# Altium PCB POV_Display.PcbDoc (part 3 of 4)
Units mm, origin at the board's own origin, x right, y up, seen from the top; angles counter-clockwise.
Board outline 207.01 x 48.01 mm, 4 copper layers (Top Layer, GND, Power, Bottom Layer), stack 1.586 mm thick; 227 components, 374 nets, 1196 pads, 657 vias.
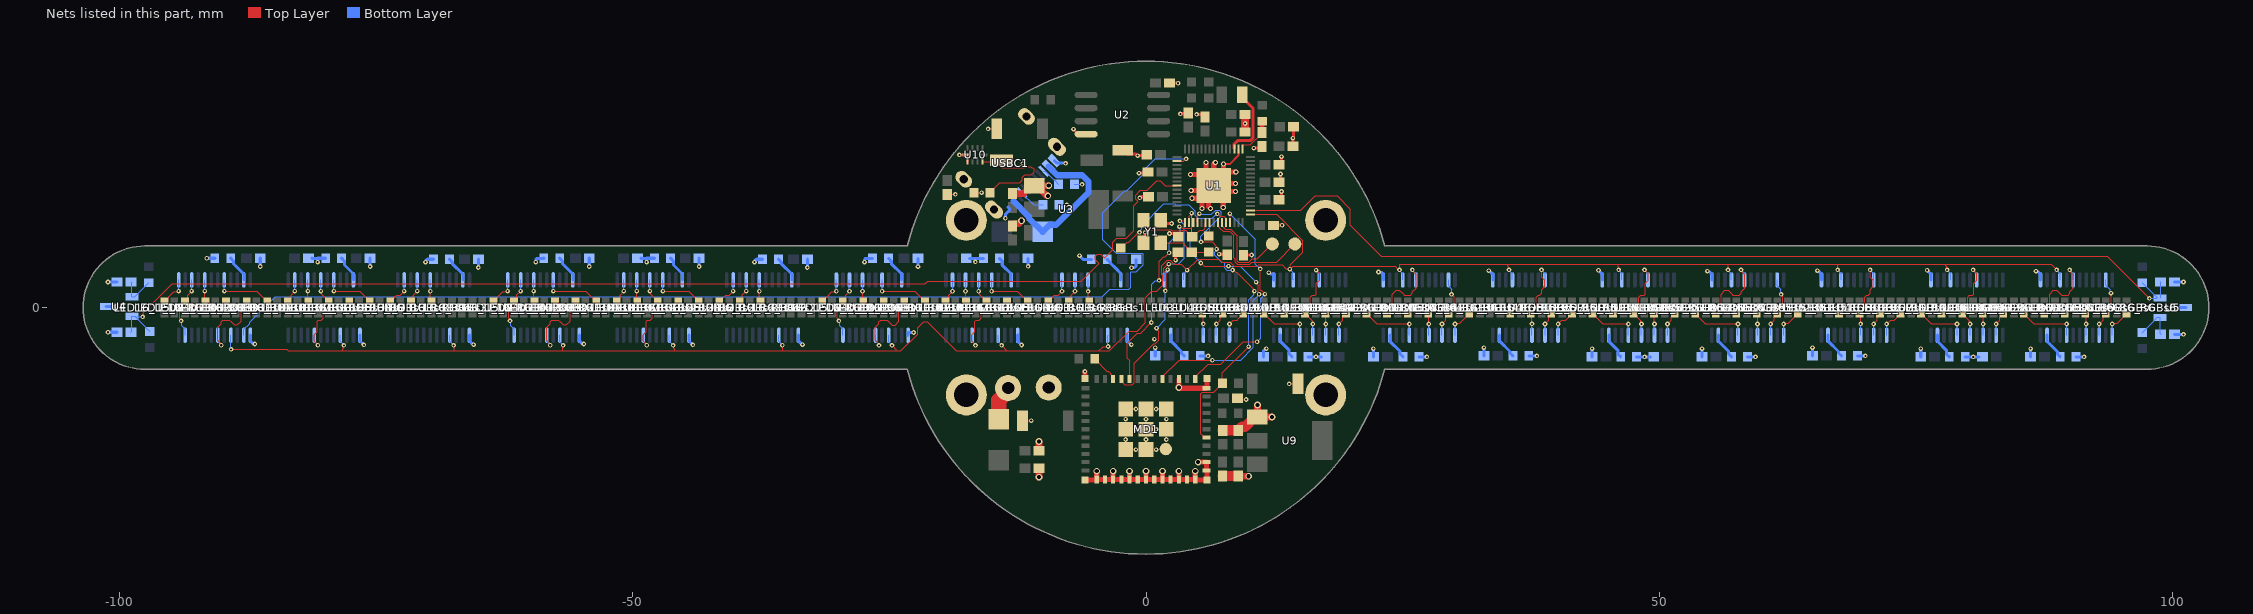
[diagram p5: the nets of this part, all layers, seen from the top]

## Via types
v1: diameter 0.45, hole 0.2, Top Layer to Bottom Layer, tented both sides, 605 vias
v2: diameter 0.65, hole 0.4, Top Layer to Bottom Layer, tented both sides, 28 vias
v3: diameter 0.5, hole 0.3, Top Layer to Bottom Layer, tented both sides, 12 vias
v4: diameter 0.45, hole 0.2, Top Layer to Bottom Layer, 12 vias

## Nets (pads, with @x,y where several pads share a name; then routed paths per layer and width w, separated by ;. In a path a pad name is that pad's centre, name@x,y a point inside that pad or via, vN(x,y) a via of type N, cw(c..) or ccw(c..) an arc to the next point about the centre after c; other vN are vias at no path point) (continued)
G1_U_16_RGBs5: LED2_U_16_RGBs5.3 U6_U_16_RGBs5.9 | length 8
  Top Layer w0.1: LED2_U_16_RGBs5.3@35.475,-0.62 35.499,-0.62 36.238,0.119 37.912,0.119 38,0.207 38,1.032 38.185,1.217 38.347,1.217 38.514,1.384 38.514,1.747 38.833,2.066 38.833,2.664 38.52,2.978 v1(38.52,3.671)
  Bottom Layer w0.1: v1(38.52,3.671) 38.52,3.637 38.857,3.299 U6_U_16_RGBs5.9@38.857,2.692
G1_U_16_RGBs6: LED2_U_16_RGBs6.3 U6_U_16_RGBs6.9 | length 8
  Top Layer w0.1: LED2_U_16_RGBs6.3@67.475,-0.62 67.499,-0.62 68.238,0.119 69.912,0.119 70,0.207 70,1.032 70.185,1.217 70.347,1.217 70.514,1.384 70.514,1.747 70.833,2.066 70.833,2.664 70.52,2.978 v1(70.52,3.671)
  Bottom Layer w0.1: v1(70.52,3.671) 70.52,3.637 70.858,3.299 U6_U_16_RGBs6.9@70.858,2.692
G2_U_16_RGBs1: LED3_U_16_RGBs1.3 U6_U_16_RGBs1.18 | length 2.1
  Top Layer w0.1: v1(-5.641,1.587) -5.641,0.732 LED3_U_16_RGBs1.3@-5.529,0.62
  Bottom Layer w0.1: v1(-5.641,1.587) U6_U_16_RGBs1.18@-5.641,2.692
G2_U_16_RGBs2: LED3_U_16_RGBs2.3 U6_U_16_RGBs2.18 | length 2.1
  Top Layer w0.1: v1(-37.659,1.596) -37.659,0.74 LED3_U_16_RGBs2.3@-37.546,0.628
  Bottom Layer w0.1: v1(-37.659,1.596) U6_U_16_RGBs2.18@-37.659,2.701
G2_U_16_RGBs3: LED3_U_16_RGBs3.3 U6_U_16_RGBs3.18 | length 2.1
  Top Layer w0.1: v1(-69.695,1.595) -69.695,0.74 LED3_U_16_RGBs3.3@-69.582,0.627
  Bottom Layer w0.1: v1(-69.695,1.595) U6_U_16_RGBs3.18@-69.695,2.7
G2_U_16_RGBs4: LED3_U_16_RGBs4.3 U6_U_16_RGBs4.18 | length 2.1
  Top Layer w0.1: LED3_U_16_RGBs4.3@5.475,-0.62 5.587,-0.732 v1(5.587,-1.587)
  Bottom Layer w0.1: U6_U_16_RGBs4.18@5.587,-2.692 v1(5.587,-1.587)
G2_U_16_RGBs5: LED3_U_16_RGBs5.3 U6_U_16_RGBs5.18 | length 2.1
  Top Layer w0.1: LED3_U_16_RGBs5.3@37.475,-0.62 37.587,-0.732 v1(37.587,-1.587)
  Bottom Layer w0.1: U6_U_16_RGBs5.18@37.587,-2.692 v1(37.587,-1.587)
G2_U_16_RGBs6: LED3_U_16_RGBs6.3 U6_U_16_RGBs6.18 | length 2.1
  Top Layer w0.1: LED3_U_16_RGBs6.3@69.475,-0.62 69.588,-0.732 v1(69.588,-1.587)
  Bottom Layer w0.1: U6_U_16_RGBs6.18@69.588,-2.692 v1(69.588,-1.587)
G3_U_16_RGBs1: LED4_U_16_RGBs1.3 U6_U_16_RGBs1.16 | length 2.3
  Top Layer w0.1: LED4_U_16_RGBs1.3@-7.529,0.62 -7.283,0.866 -7.283,1.221 v1(-6.911,1.592)
  Bottom Layer w0.1: v1(-6.911,1.592) U6_U_16_RGBs1.16@-6.911,2.692
G3_U_16_RGBs2: LED4_U_16_RGBs2.3 U6_U_16_RGBs2.16 | length 2.3
  Top Layer w0.1: LED4_U_16_RGBs2.3@-39.546,0.628 -39.3,0.874 -39.3,1.229 v1(-38.929,1.6)
  Bottom Layer w0.1: v1(-38.929,1.6) U6_U_16_RGBs2.16@-38.929,2.701
G3_U_16_RGBs3: LED4_U_16_RGBs3.3 U6_U_16_RGBs3.16 | length 2.3
  Top Layer w0.1: LED4_U_16_RGBs3.3@-71.582,0.627 -71.336,0.874 -71.336,1.228 v1(-70.965,1.599)
  Bottom Layer w0.1: v1(-70.965,1.599) U6_U_16_RGBs3.16@-70.965,2.7
G3_U_16_RGBs4: LED4_U_16_RGBs4.3 U6_U_16_RGBs4.16 | length 2.3
  Top Layer w0.1: v1(6.857,-1.592) 7.229,-1.221 7.229,-0.866 LED4_U_16_RGBs4.3@7.475,-0.62
  Bottom Layer w0.1: U6_U_16_RGBs4.16@6.857,-2.692 v1(6.857,-1.592)
G3_U_16_RGBs5: LED4_U_16_RGBs5.3 U6_U_16_RGBs5.16 | length 2.3
  Top Layer w0.1: v1(38.857,-1.592) 39.229,-1.221 39.229,-0.866 LED4_U_16_RGBs5.3@39.475,-0.62
  Bottom Layer w0.1: U6_U_16_RGBs5.16@38.857,-2.692 v1(38.857,-1.592)
G3_U_16_RGBs6: LED4_U_16_RGBs6.3 U6_U_16_RGBs6.16 | length 2.3
  Top Layer w0.1: v1(70.858,-1.592) 71.229,-1.221 71.229,-0.866 LED4_U_16_RGBs6.3@71.475,-0.62
  Bottom Layer w0.1: U6_U_16_RGBs6.16@70.858,-2.692 v1(70.858,-1.592)
G4_U_16_RGBs1: LED5_U_16_RGBs1.3 U6_U_16_RGBs1.14 | length 2.9
  Top Layer w0.1: LED5_U_16_RGBs1.3@-9.529,0.62 -9.505,0.62 -9.104,1.021 -9.104,1.032 -8.919,1.217 -8.556,1.217 v1(-8.181,1.592)
  Bottom Layer w0.1: v1(-8.181,1.592) U6_U_16_RGBs1.14@-8.181,2.692
G4_U_16_RGBs2: LED5_U_16_RGBs2.3 U6_U_16_RGBs2.14 | length 2.9
  Top Layer w0.1: LED5_U_16_RGBs2.3@-41.546,0.628 -41.522,0.628 -41.121,1.029 -41.121,1.041 -40.936,1.225 -40.574,1.225 v1(-40.199,1.6)
  Bottom Layer w0.1: v1(-40.199,1.6) U6_U_16_RGBs2.14@-40.199,2.701
G4_U_16_RGBs3: LED5_U_16_RGBs3.3 U6_U_16_RGBs3.14 | length 2.9
  Top Layer w0.1: LED5_U_16_RGBs3.3@-73.582,0.627 -73.558,0.627 -73.157,1.029 -73.157,1.04 -72.973,1.224 -72.61,1.224 v1(-72.235,1.599)
  Bottom Layer w0.1: v1(-72.235,1.599) U6_U_16_RGBs3.14@-72.235,2.7
G4_U_16_RGBs4: LED5_U_16_RGBs4.3 U6_U_16_RGBs4.14 | length 2.9
  Top Layer w0.1: v1(8.127,-1.592) 8.503,-1.217 8.865,-1.217 9.05,-1.032 9.05,-1.021 9.451,-0.62 LED5_U_16_RGBs4.3@9.475,-0.62
  Bottom Layer w0.1: U6_U_16_RGBs4.14@8.127,-2.692 v1(8.127,-1.592)
G4_U_16_RGBs5: LED5_U_16_RGBs5.3 U6_U_16_RGBs5.14 | length 2.9
  Top Layer w0.1: v1(40.127,-1.592) 40.502,-1.217 40.865,-1.217 41.05,-1.032 41.05,-1.021 41.451,-0.62 LED5_U_16_RGBs5.3@41.475,-0.62
  Bottom Layer w0.1: U6_U_16_RGBs5.14@40.127,-2.692 v1(40.127,-1.592)
G4_U_16_RGBs6: LED5_U_16_RGBs6.3 U6_U_16_RGBs6.14 | length 2.9
  Top Layer w0.1: v1(72.128,-1.592) 72.503,-1.217 72.865,-1.217 73.05,-1.032 73.05,-1.021 73.451,-0.62 LED5_U_16_RGBs6.3@73.475,-0.62
  Bottom Layer w0.1: U6_U_16_RGBs6.14@72.128,-2.692 v1(72.128,-1.592)
G5_U_16_RGBs1: LED6_U_16_RGBs1.3 U7_U_16_RGBs1.20 | length 5
  Top Layer w0.1: v1(-15.031,1.592) -12.525,1.592 -11.553,0.62 LED6_U_16_RGBs1.3@-11.529,0.62
  Bottom Layer w0.1: v1(-15.031,1.592) U7_U_16_RGBs1.20@-15.031,2.692
G5_U_16_RGBs2: LED6_U_16_RGBs2.3 U7_U_16_RGBs2.20 | length 5
  Top Layer w0.1: v1(-47.049,1.6) -44.542,1.6 -43.57,0.628 LED6_U_16_RGBs2.3@-43.546,0.628
  Bottom Layer w0.1: v1(-47.049,1.6) U7_U_16_RGBs2.20@-47.049,2.701
G5_U_16_RGBs3: LED6_U_16_RGBs3.3 U7_U_16_RGBs3.20 | length 5
  Top Layer w0.1: v1(-79.085,1.599) -76.579,1.599 -75.607,0.627 LED6_U_16_RGBs3.3@-75.582,0.627
  Bottom Layer w0.1: v1(-79.085,1.599) U7_U_16_RGBs3.20@-79.085,2.7
G5_U_16_RGBs4: LED6_U_16_RGBs4.3 U7_U_16_RGBs4.20 | length 5
  Top Layer w0.1: LED6_U_16_RGBs4.3@11.475,-0.62 11.499,-0.62 12.471,-1.592 v1(14.978,-1.592)
  Bottom Layer w0.1: U7_U_16_RGBs4.20@14.978,-2.692 v1(14.978,-1.592)
G5_U_16_RGBs5: LED6_U_16_RGBs5.3 U7_U_16_RGBs5.20 | length 5
  Top Layer w0.1: LED6_U_16_RGBs5.3@43.475,-0.62 43.499,-0.62 44.471,-1.592 v1(46.978,-1.592)
  Bottom Layer w0.1: U7_U_16_RGBs5.20@46.978,-2.692 v1(46.978,-1.592)
G5_U_16_RGBs6: LED6_U_16_RGBs6.3 U7_U_16_RGBs6.20 | length 5
  Top Layer w0.1: LED6_U_16_RGBs6.3@75.475,-0.62 75.499,-0.62 76.471,-1.592 v1(78.978,-1.592)
  Bottom Layer w0.1: U7_U_16_RGBs6.20@78.978,-2.692 v1(78.978,-1.592)
G6_U_16_RGBs1: LED7_U_16_RGBs1.3 U7_U_16_RGBs1.8 | length 8.2
  Top Layer w0.1: v1(-16.599,-3.671) -16.599,-3.659 -16.964,-3.294 -16.964,-2.658 -16.654,-2.348 -16.654,-1.319 -16.551,-1.217 -16.239,-1.217 -16.054,-1.032 -16.054,-0.207 -15.966,-0.119 -14.292,-0.119 -13.553,0.62 LED7_U_16_RGBs1.3@-13.529,0.62
  Bottom Layer w0.1: U7_U_16_RGBs1.8@-16.936,-2.692 -16.936,-3.299 -16.599,-3.637 v1(-16.599,-3.671)
G6_U_16_RGBs2: LED7_U_16_RGBs2.3 U7_U_16_RGBs2.8 | length 8.2
  Top Layer w0.1: v1(-48.616,-3.663) -48.616,-3.651 -48.981,-3.285 -48.981,-2.65 -48.671,-2.34 -48.671,-1.311 -48.569,-1.209 -48.256,-1.209 -48.071,-1.024 -48.071,-0.199 -47.983,-0.111 -46.309,-0.111 -45.57,0.628 LED7_U_16_RGBs2.3@-45.546,0.628
  Bottom Layer w0.1: U7_U_16_RGBs2.8@-48.954,-2.684 -48.954,-3.291 -48.616,-3.629 v1(-48.616,-3.663)
G6_U_16_RGBs3: LED7_U_16_RGBs3.3 U7_U_16_RGBs3.8 | length 8.2
  Top Layer w0.1: v1(-80.652,-3.663) -80.652,-3.651 -81.018,-3.286 -81.018,-2.651 -80.707,-2.341 -80.707,-1.312 -80.605,-1.209 -80.292,-1.209 -80.107,-1.024 -80.107,-0.2 -80.019,-0.112 -78.346,-0.112 -77.607,0.627 LED7_U_16_RGBs3.3@-77.582,0.627
  Bottom Layer w0.1: U7_U_16_RGBs3.8@-80.99,-2.685 -80.99,-3.291 -80.652,-3.629 v1(-80.652,-3.663)
G6_U_16_RGBs4: LED7_U_16_RGBs4.3 U7_U_16_RGBs4.8 | length 8.1
  Top Layer w0.1: LED7_U_16_RGBs4.3@13.475,-0.62 13.499,-0.62 14.238,0.119 15.912,0.119 16,0.207 16,1.032 16.185,1.217 16.497,1.217 16.6,1.319 16.6,2.348 16.91,2.658 16.91,3.294 16.565,3.639 v1(16.565,3.655)
  Bottom Layer w0.1: v1(16.565,3.655) 16.565,3.619 16.883,3.301 U7_U_16_RGBs4.8@16.883,2.692
G6_U_16_RGBs5: LED7_U_16_RGBs5.3 U7_U_16_RGBs5.8 | length 8.2
  Top Layer w0.1: LED7_U_16_RGBs5.3@45.475,-0.62 45.499,-0.62 46.238,0.119 47.912,0.119 48,0.207 48,1.032 48.185,1.217 48.497,1.217 48.6,1.319 48.6,2.348 48.91,2.658 48.91,3.294 48.545,3.659 v1(48.545,3.671)
  Bottom Layer w0.1: v1(48.545,3.671) 48.545,3.637 48.883,3.299 U7_U_16_RGBs5.8@48.883,2.692
G6_U_16_RGBs6: LED7_U_16_RGBs6.3 U7_U_16_RGBs6.8 | length 8.2
  Top Layer w0.1: LED7_U_16_RGBs6.3@77.475,-0.62 77.499,-0.62 78.238,0.119 79.912,0.119 80,0.207 80,1.032 80.185,1.217 80.497,1.217 80.6,1.319 80.6,2.348 80.91,2.658 80.91,3.294 80.545,3.659 v1(80.545,3.671)
  Bottom Layer w0.1: v1(80.545,3.671) 80.545,3.637 80.883,3.299 U7_U_16_RGBs6.8@80.883,2.692
G7_U_16_RGBs1: LED8_U_16_RGBs1.3 U7_U_16_RGBs1.18 | length 2.4
  Top Layer w0.1: v1(-16.301,1.592) -16.235,1.525 -16.235,1.301 -15.553,0.62 LED8_U_16_RGBs1.3@-15.529,0.62
  Bottom Layer w0.1: v1(-16.301,1.592) U7_U_16_RGBs1.18@-16.301,2.692
G7_U_16_RGBs2: LED8_U_16_RGBs2.3 U7_U_16_RGBs2.18 | length 2.4
  Top Layer w0.1: v1(-48.319,1.6) -48.252,1.533 -48.252,1.309 -47.57,0.628 LED8_U_16_RGBs2.3@-47.546,0.628
  Bottom Layer w0.1: v1(-48.319,1.6) U7_U_16_RGBs2.18@-48.319,2.701
G7_U_16_RGBs3: LED8_U_16_RGBs3.3 U7_U_16_RGBs3.18 | length 2.4
  Top Layer w0.1: v1(-80.355,1.599) -80.288,1.532 -80.288,1.309 -79.607,0.627 LED8_U_16_RGBs3.3@-79.582,0.627
  Bottom Layer w0.1: v1(-80.355,1.599) U7_U_16_RGBs3.18@-80.355,2.7
G7_U_16_RGBs4: LED8_U_16_RGBs4.3 U7_U_16_RGBs4.18 | length 2.4
  Top Layer w0.1: LED8_U_16_RGBs4.3@15.475,-0.62 15.499,-0.62 16.181,-1.301 16.181,-1.525 v1(16.248,-1.592)
  Bottom Layer w0.1: U7_U_16_RGBs4.18@16.248,-2.692 v1(16.248,-1.592)
G7_U_16_RGBs5: LED8_U_16_RGBs5.3 U7_U_16_RGBs5.18 | length 2.4
  Top Layer w0.1: LED8_U_16_RGBs5.3@47.475,-0.62 47.499,-0.62 48.181,-1.301 48.181,-1.525 v1(48.248,-1.592)
  Bottom Layer w0.1: U7_U_16_RGBs5.18@48.248,-2.692 v1(48.248,-1.592)
G7_U_16_RGBs6: LED8_U_16_RGBs6.3 U7_U_16_RGBs6.18 | length 2.4
  Top Layer w0.1: LED8_U_16_RGBs6.3@79.475,-0.62 79.499,-0.62 80.181,-1.301 80.181,-1.525 v1(80.248,-1.592)
  Bottom Layer w0.1: U7_U_16_RGBs6.18@80.248,-2.692 v1(80.248,-1.592)
G8_U_16_RGBs1: LED9_U_16_RGBs1.3 U7_U_16_RGBs1.16 | length 2.1
  Top Layer w0.1: v1(-17.571,1.592) -17.571,0.662 LED9_U_16_RGBs1.3@-17.529,0.62
  Bottom Layer w0.1: v1(-17.571,1.592) U7_U_16_RGBs1.16@-17.571,2.692
G8_U_16_RGBs2: LED9_U_16_RGBs2.3 U7_U_16_RGBs2.16 | length 2.1
  Top Layer w0.1: v1(-49.589,1.6) -49.589,0.67 LED9_U_16_RGBs2.3@-49.546,0.628
  Bottom Layer w0.1: v1(-49.589,1.6) U7_U_16_RGBs2.16@-49.589,2.701
G8_U_16_RGBs3: LED9_U_16_RGBs3.3 U7_U_16_RGBs3.16 | length 2.1
  Top Layer w0.1: v1(-81.625,1.599) -81.625,0.67 LED9_U_16_RGBs3.3@-81.582,0.627
  Bottom Layer w0.1: v1(-81.625,1.599) U7_U_16_RGBs3.16@-81.625,2.7
G8_U_16_RGBs4: LED9_U_16_RGBs4.3 U7_U_16_RGBs4.16 | length 2.1
  Top Layer w0.1: LED9_U_16_RGBs4.3@17.475,-0.62 17.518,-0.662 v1(17.518,-1.592)
  Bottom Layer w0.1: U7_U_16_RGBs4.16@17.518,-2.692 v1(17.518,-1.592)
G8_U_16_RGBs5: LED9_U_16_RGBs5.3 U7_U_16_RGBs5.16 | length 2.1
  Top Layer w0.1: LED9_U_16_RGBs5.3@49.475,-0.62 49.518,-0.662 v1(49.518,-1.592)
  Bottom Layer w0.1: U7_U_16_RGBs5.16@49.518,-2.692 v1(49.518,-1.592)
G8_U_16_RGBs6: LED9_U_16_RGBs6.3 U7_U_16_RGBs6.16 | length 2.1
  Top Layer w0.1: LED9_U_16_RGBs6.3@81.475,-0.62 81.518,-0.662 v1(81.518,-1.592)
  Bottom Layer w0.1: U7_U_16_RGBs6.16@81.518,-2.692 v1(81.518,-1.592)
G9_U_16_RGBs1: LED10_U_16_RGBs1.3 U7_U_16_RGBs1.14 | length 2.4
  Top Layer w0.1: LED10_U_16_RGBs1.3@-19.529,0.62 -19.505,0.62 -19.204,0.92 -19.204,1.212 -18.841,1.575 v1(-18.841,1.592)
  Bottom Layer w0.1: v1(-18.841,1.592) U7_U_16_RGBs1.14@-18.841,2.692
G9_U_16_RGBs2: LED10_U_16_RGBs2.3 U7_U_16_RGBs2.14 | length 2.4
  Top Layer w0.1: LED10_U_16_RGBs2.3@-51.546,0.628 -51.522,0.628 -51.222,0.928 -51.222,1.22 -50.859,1.583 v1(-50.859,1.6)
  Bottom Layer w0.1: v1(-50.859,1.6) U7_U_16_RGBs2.14@-50.859,2.701
G9_U_16_RGBs3: LED10_U_16_RGBs3.3 U7_U_16_RGBs3.14 | length 2.4
  Top Layer w0.1: LED10_U_16_RGBs3.3@-83.582,0.627 -83.558,0.627 -83.258,0.928 -83.258,1.22 -82.895,1.583 v1(-82.895,1.599)
  Bottom Layer w0.1: v1(-82.895,1.599) U7_U_16_RGBs3.14@-82.895,2.7
G9_U_16_RGBs4: LED10_U_16_RGBs4.3 U7_U_16_RGBs4.14 | length 2.4
  Top Layer w0.1: v1(18.788,-1.592) 18.788,-1.575 19.15,-1.212 19.15,-0.92 19.451,-0.62 LED10_U_16_RGBs4.3@19.475,-0.62
  Bottom Layer w0.1: U7_U_16_RGBs4.14@18.788,-2.692 v1(18.788,-1.592)
G9_U_16_RGBs5: LED10_U_16_RGBs5.3 U7_U_16_RGBs5.14 | length 2.4
  Top Layer w0.1: v1(50.788,-1.592) 50.788,-1.575 51.15,-1.212 51.15,-0.92 51.451,-0.62 LED10_U_16_RGBs5.3@51.475,-0.62
  Bottom Layer w0.1: U7_U_16_RGBs5.14@50.788,-2.692 v1(50.788,-1.592)
G9_U_16_RGBs6: LED10_U_16_RGBs6.3 U7_U_16_RGBs6.14 | length 2.4
  Top Layer w0.1: v1(82.788,-1.592) 82.788,-1.575 83.15,-1.212 83.15,-0.92 83.451,-0.62 LED10_U_16_RGBs6.3@83.475,-0.62
  Bottom Layer w0.1: U7_U_16_RGBs6.14@82.788,-2.692 v1(82.788,-1.592)
G10_U_16_RGBs1: LED11_U_16_RGBs1.3 U8_U_16_RGBs1.20 | length 5.7
  Top Layer w0.1: v1(-25.701,1.592) -22.525,1.592 -21.553,0.62 LED11_U_16_RGBs1.3@-21.529,0.62
  Bottom Layer w0.1: v1(-25.701,1.592) U8_U_16_RGBs1.20@-25.701,2.692
G10_U_16_RGBs2: LED11_U_16_RGBs2.3 U8_U_16_RGBs2.20 | length 5.7
  Top Layer w0.1: v1(-57.719,1.6) -54.542,1.6 -53.57,0.628 LED11_U_16_RGBs2.3@-53.546,0.628
  Bottom Layer w0.1: v1(-57.719,1.6) U8_U_16_RGBs2.20@-57.719,2.701
G10_U_16_RGBs3: LED11_U_16_RGBs3.3 U8_U_16_RGBs3.20 | length 5.7
  Top Layer w0.1: v1(-89.755,1.599) -86.579,1.599 -85.607,0.627 LED11_U_16_RGBs3.3@-85.582,0.627
  Bottom Layer w0.1: v1(-89.755,1.599) U8_U_16_RGBs3.20@-89.755,2.7
G10_U_16_RGBs4: LED11_U_16_RGBs4.3 U8_U_16_RGBs4.20 | length 5.7
  Top Layer w0.1: LED11_U_16_RGBs4.3@21.475,-0.62 21.499,-0.62 22.471,-1.592 v1(25.648,-1.592)
  Bottom Layer w0.1: U8_U_16_RGBs4.20@25.648,-2.692 v1(25.648,-1.592)
G10_U_16_RGBs5: LED11_U_16_RGBs5.3 U8_U_16_RGBs5.20 | length 5.7
  Top Layer w0.1: LED11_U_16_RGBs5.3@53.475,-0.62 53.499,-0.62 54.471,-1.592 v1(57.647,-1.592)
  Bottom Layer w0.1: U8_U_16_RGBs5.20@57.647,-2.692 v1(57.647,-1.592)
G10_U_16_RGBs6: LED11_U_16_RGBs6.3 U8_U_16_RGBs6.20 | length 5.7
  Top Layer w0.1: LED11_U_16_RGBs6.3@85.475,-0.62 85.499,-0.62 86.471,-1.592 v1(89.648,-1.592)
  Bottom Layer w0.1: U8_U_16_RGBs6.20@89.648,-2.692 v1(89.648,-1.592)
G11_U_16_RGBs1: LED12_U_16_RGBs1.3 U8_U_16_RGBs1.6 | length 8.2
  Top Layer w0.1: v1(-25.999,-3.671) -26.066,-3.604 -26.066,-3.488 -26.354,-3.2 -26.354,-1.908 -26.004,-1.558 -26.004,-1.378 -25.843,-1.217 -25.213,-1.217 -25.093,-1.336 -24.734,-1.695 -24.424,-1.695 -24.054,-1.326 -24.054,-0.208 -23.854,-0.007 -23.854,0.319 -23.553,0.62 LED12_U_16_RGBs1.3@-23.529,0.62
  Bottom Layer w0.1: U8_U_16_RGBs1.6@-26.336,-2.692 -26.336,-3.299 -25.999,-3.637 v1(-25.999,-3.671)
G11_U_16_RGBs2: LED12_U_16_RGBs2.3 U8_U_16_RGBs2.6 | length 8.2
  Top Layer w0.1: v1(-58.016,-3.663) -58.083,-3.596 -58.083,-3.48 -58.371,-3.192 -58.371,-1.9 -58.021,-1.55 -58.021,-1.369 -57.86,-1.209 -57.23,-1.209 -57.11,-1.328 -56.752,-1.687 -56.441,-1.687 -56.071,-1.317 -56.071,-0.199 -55.871,0.001 -55.871,0.327 -55.57,0.628 LED12_U_16_RGBs2.3@-55.546,0.628
  Bottom Layer w0.1: U8_U_16_RGBs2.6@-58.354,-2.684 -58.354,-3.291 -58.016,-3.629 v1(-58.016,-3.663)
G11_U_16_RGBs3: LED12_U_16_RGBs3.3 U8_U_16_RGBs3.6 | length 8.2
  Top Layer w0.1: v1(-90.052,-3.663) -90.119,-3.596 -90.119,-3.481 -90.408,-3.192 -90.408,-1.901 -90.057,-1.551 -90.057,-1.37 -89.897,-1.209 -89.266,-1.209 -89.147,-1.329 -88.788,-1.688 -88.477,-1.688 -88.107,-1.318 -88.107,-0.2 -87.907,0 -87.907,0.327 -87.607,0.627 LED12_U_16_RGBs3.3@-87.582,0.627
  Bottom Layer w0.1: U8_U_16_RGBs3.6@-90.39,-2.685 -90.39,-3.291 -90.052,-3.629 v1(-90.052,-3.663)
G11_U_16_RGBs4: LED12_U_16_RGBs4.3 U8_U_16_RGBs4.6 | length 8.2
  Top Layer w0.1: LED12_U_16_RGBs4.3@23.475,-0.62 23.499,-0.62 23.8,-0.319 23.8,0.007 24,0.208 24,1.326 24.37,1.695 24.68,1.695 25.039,1.336 25.159,1.217 25.789,1.217 25.95,1.378 25.95,1.558 26.3,1.908 26.3,3.2 26.012,3.488 26.012,3.604 v1(25.945,3.671)
  Bottom Layer w0.1: v1(25.945,3.671) 25.945,3.637 26.283,3.299 U8_U_16_RGBs4.6@26.283,2.692
G11_U_16_RGBs5: LED12_U_16_RGBs5.3 U8_U_16_RGBs5.6 | length 8.2
  Top Layer w0.1: LED12_U_16_RGBs5.3@55.475,-0.62 55.499,-0.62 55.8,-0.319 55.8,0.007 56,0.208 56,1.326 56.37,1.695 56.68,1.695 57.039,1.336 57.159,1.217 57.789,1.217 57.95,1.378 57.95,1.558 58.3,1.908 58.3,3.2 58.012,3.488 58.012,3.604 v1(57.945,3.671)
  Bottom Layer w0.1: v1(57.945,3.671) 57.945,3.637 58.282,3.299 U8_U_16_RGBs5.6@58.282,2.692
G11_U_16_RGBs6: LED12_U_16_RGBs6.3 U8_U_16_RGBs6.6 | length 8.2
  Top Layer w0.1: LED12_U_16_RGBs6.3@87.475,-0.62 87.499,-0.62 87.8,-0.319 87.8,0.007 88,0.208 88,1.326 88.37,1.695 88.68,1.695 89.039,1.336 89.159,1.217 89.789,1.217 89.95,1.378 89.95,1.558 90.3,1.908 90.3,3.2 90.012,3.488 90.012,3.604 v1(89.945,3.671)
  Bottom Layer w0.1: v1(89.945,3.671) 89.945,3.637 90.283,3.299 U8_U_16_RGBs6.6@90.283,2.692
G12_U_16_RGBs1: LED13_U_16_RGBs1.3 U8_U_16_RGBs1.11 | length 7.6
  Top Layer w0.1: v1(-29.911,-1.295) -29.911,-1.2 -30.054,-1.058 -30.054,-0.207 -29.727,0.119 -26.054,0.119 -25.553,0.62 LED13_U_16_RGBs1.3@-25.529,0.62
  Bottom Layer w0.1: v1(-29.911,-1.295) -29.844,-1.362 -29.844,-1.776 -29.511,-2.109 U8_U_16_RGBs1.11@-29.511,-2.692
G12_U_16_RGBs2: LED13_U_16_RGBs2.3 U8_U_16_RGBs2.11 | length 7.6
  Top Layer w0.1: v1(-61.928,-1.287) -61.928,-1.192 -62.071,-1.05 -62.071,-0.199 -61.744,0.127 -58.071,0.127 -57.57,0.628 LED13_U_16_RGBs2.3@-57.546,0.628
  Bottom Layer w0.1: v1(-61.928,-1.287) -61.861,-1.354 -61.861,-1.768 -61.529,-2.101 U8_U_16_RGBs2.11@-61.529,-2.684
G12_U_16_RGBs3: LED13_U_16_RGBs3.3 U8_U_16_RGBs3.11 | length 7.6
  Top Layer w0.1: v1(-93.964,-1.288) -93.964,-1.193 -94.107,-1.05 -94.107,-0.2 -93.781,0.127 -90.107,0.127 -89.607,0.627 LED13_U_16_RGBs3.3@-89.582,0.627
  Bottom Layer w0.1: v1(-93.964,-1.288) -93.897,-1.355 -93.897,-1.769 -93.565,-2.101 U8_U_16_RGBs3.11@-93.565,-2.685
G12_U_16_RGBs4: LED13_U_16_RGBs4.3 U8_U_16_RGBs4.11 | length 7.6
  Top Layer w0.1: LED13_U_16_RGBs4.3@25.475,-0.62 25.499,-0.62 26,-0.119 29.673,-0.119 30,0.207 30,1.032 29.753,1.279 v1(29.753,1.295)
  Bottom Layer w0.1: U8_U_16_RGBs4.11@29.458,2.692 29.458,2.109 29.79,1.776 29.79,1.332 v1(29.753,1.295)
G12_U_16_RGBs5: LED13_U_16_RGBs5.3 U8_U_16_RGBs5.11 | length 7.6
  Top Layer w0.1: LED13_U_16_RGBs5.3@57.475,-0.62 57.499,-0.62 58,-0.119 61.673,-0.119 62,0.207 62,1.058 61.857,1.2 v1(61.857,1.295)
  Bottom Layer w0.1: U8_U_16_RGBs5.11@61.457,2.692 61.457,2.109 61.79,1.776 61.79,1.362 v1(61.857,1.295)
G12_U_16_RGBs6: LED13_U_16_RGBs6.3 U8_U_16_RGBs6.11 | length 7.6
  Top Layer w0.1: LED13_U_16_RGBs6.3@89.475,-0.62 89.499,-0.62 90,-0.119 93.673,-0.119 94,0.207 94,1.386 v1(93.971,1.414)
  Bottom Layer w0.1: U8_U_16_RGBs6.11@93.458,2.692 93.458,2.189 93.622,2.024 93.626,2.024 93.905,1.745 93.905,1.481 v1(93.971,1.414)
G13_U_16_RGBs1: LED14_U_16_RGBs1.3 U8_U_16_RGBs1.17 | length 2.1
  Top Layer w0.1: v1(-27.606,1.592) -27.606,0.697 LED14_U_16_RGBs1.3@-27.529,0.62
  Bottom Layer w0.1: v1(-27.606,1.592) U8_U_16_RGBs1.17@-27.606,2.692
G13_U_16_RGBs2: LED14_U_16_RGBs2.3 U8_U_16_RGBs2.17 | length 2.1
  Top Layer w0.1: v1(-59.624,1.6) -59.624,0.705 LED14_U_16_RGBs2.3@-59.546,0.628
  Bottom Layer w0.1: v1(-59.624,1.6) U8_U_16_RGBs2.17@-59.624,2.701
G13_U_16_RGBs3: LED14_U_16_RGBs3.3 U8_U_16_RGBs3.17 | length 2.1
  Top Layer w0.1: v1(-91.66,1.599) -91.66,0.705 LED14_U_16_RGBs3.3@-91.582,0.627
  Bottom Layer w0.1: v1(-91.66,1.599) U8_U_16_RGBs3.17@-91.66,2.7
G13_U_16_RGBs4: LED14_U_16_RGBs4.3 U8_U_16_RGBs4.17 | length 2.1
  Top Layer w0.1: LED14_U_16_RGBs4.3@27.475,-0.62 27.553,-0.697 v1(27.553,-1.592)
  Bottom Layer w0.1: U8_U_16_RGBs4.17@27.553,-2.692 v1(27.553,-1.592)
G13_U_16_RGBs5: LED14_U_16_RGBs5.3 U8_U_16_RGBs5.17 | length 2.1
  Top Layer w0.1: LED14_U_16_RGBs5.3@59.475,-0.62 59.552,-0.697 v1(59.552,-1.592)
  Bottom Layer w0.1: U8_U_16_RGBs5.17@59.552,-2.692 v1(59.552,-1.592)
G13_U_16_RGBs6: LED14_U_16_RGBs6.3 U8_U_16_RGBs6.17 | length 2.1
  Top Layer w0.1: LED14_U_16_RGBs6.3@91.475,-0.62 91.553,-0.697 v1(91.553,-1.592)
  Bottom Layer w0.1: U8_U_16_RGBs6.17@91.553,-2.692 v1(91.553,-1.592)
G14_U_16_RGBs1: LED15_U_16_RGBs1.3 U8_U_16_RGBs1.15 | length 2.3
  Top Layer w0.1: LED15_U_16_RGBs1.3@-29.529,0.62 -29.248,0.901 -29.248,1.221 v1(-28.876,1.592)
  Bottom Layer w0.1: v1(-28.876,1.592) U8_U_16_RGBs1.15@-28.876,2.692
G14_U_16_RGBs2: LED15_U_16_RGBs2.3 U8_U_16_RGBs2.15 | length 2.3
  Top Layer w0.1: LED15_U_16_RGBs2.3@-61.546,0.628 -61.265,0.909 -61.265,1.229 v1(-60.894,1.6)
  Bottom Layer w0.1: v1(-60.894,1.6) U8_U_16_RGBs2.15@-60.894,2.701
G14_U_16_RGBs3: LED15_U_16_RGBs3.3 U8_U_16_RGBs3.15 | length 2.3
  Top Layer w0.1: LED15_U_16_RGBs3.3@-93.582,0.627 -93.301,0.909 -93.301,1.228 v1(-92.93,1.599)
  Bottom Layer w0.1: v1(-92.93,1.599) U8_U_16_RGBs3.15@-92.93,2.7
G14_U_16_RGBs4: LED15_U_16_RGBs4.3 U8_U_16_RGBs4.15 | length 2.3
  Top Layer w0.1: v1(28.823,-1.592) 29.194,-1.221 29.194,-0.901 LED15_U_16_RGBs4.3@29.475,-0.62
  Bottom Layer w0.1: U8_U_16_RGBs4.15@28.823,-2.692 v1(28.823,-1.592)
G14_U_16_RGBs5: LED15_U_16_RGBs5.3 U8_U_16_RGBs5.15 | length 2.3
  Top Layer w0.1: v1(60.822,-1.592) 61.194,-1.221 61.194,-0.901 LED15_U_16_RGBs5.3@61.475,-0.62
  Bottom Layer w0.1: U8_U_16_RGBs5.15@60.822,-2.692 v1(60.822,-1.592)
G14_U_16_RGBs6: LED15_U_16_RGBs6.3 U8_U_16_RGBs6.15 | length 2.3
  Top Layer w0.1: v1(92.823,-1.592) 93.194,-1.221 93.194,-0.901 LED15_U_16_RGBs6.3@93.475,-0.62
  Bottom Layer w0.1: U8_U_16_RGBs6.15@92.823,-2.692 v1(92.823,-1.592)
G15_U_16_RGBs1: LED16_U_16_RGBs1.3 U8_U_16_RGBs1.13 | length 2.9
  Top Layer w0.1: LED16_U_16_RGBs1.3@-31.529,0.62 -31.505,0.62 -31.104,1.021 -31.104,1.032 -30.611,1.525 -30.213,1.525 v1(-30.146,1.592)
  Bottom Layer w0.1: v1(-30.146,1.592) U8_U_16_RGBs1.13@-30.146,2.692
G15_U_16_RGBs2: LED16_U_16_RGBs2.3 U8_U_16_RGBs2.13 | length 2.9
  Top Layer w0.1: LED16_U_16_RGBs2.3@-63.546,0.628 -63.522,0.628 -63.121,1.029 -63.121,1.041 -62.628,1.533 -62.231,1.533 v1(-62.164,1.6)
  Bottom Layer w0.1: v1(-62.164,1.6) U8_U_16_RGBs2.13@-62.164,2.701
G15_U_16_RGBs3: LED16_U_16_RGBs3.3 U8_U_16_RGBs3.13 | length 2.9
  Top Layer w0.1: LED16_U_16_RGBs3.3@-95.582,0.627 -95.558,0.627 -95.157,1.029 -95.157,1.04 -94.665,1.532 -94.267,1.532 v1(-94.2,1.599)
  Bottom Layer w0.1: v1(-94.2,1.599) U8_U_16_RGBs3.13@-94.2,2.7
G15_U_16_RGBs4: LED16_U_16_RGBs4.3 U8_U_16_RGBs4.13 | length 2.9
  Top Layer w0.1: v1(30.093,-1.592) 30.159,-1.525 30.557,-1.525 31.05,-1.032 31.05,-1.021 31.451,-0.62 LED16_U_16_RGBs4.3@31.475,-0.62
  Bottom Layer w0.1: U8_U_16_RGBs4.13@30.093,-2.692 v1(30.093,-1.592)
G15_U_16_RGBs5: LED16_U_16_RGBs5.3 U8_U_16_RGBs5.13 | length 2.9
  Top Layer w0.1: v1(62.092,-1.592) 62.159,-1.525 62.557,-1.525 63.05,-1.032 63.05,-1.021 63.451,-0.62 LED16_U_16_RGBs5.3@63.475,-0.62
  Bottom Layer w0.1: U8_U_16_RGBs5.13@62.092,-2.692 v1(62.092,-1.592)
G15_U_16_RGBs6: LED16_U_16_RGBs6.3 U8_U_16_RGBs6.13 | length 2.9
  Top Layer w0.1: v1(94.093,-1.592) 94.159,-1.525 94.557,-1.525 95.05,-1.032 95.05,-1.021 95.451,-0.62 LED16_U_16_RGBs6.3@95.475,-0.62
  Bottom Layer w0.1: U8_U_16_RGBs6.13@94.093,-2.692 v1(94.093,-1.592)
GND: C1.1 C2.1 C3.1 C4.1 C5.1 C6.1 C7.1 C8.1 C9.1 C10.1 C11.1 C12.1 C13.1 C14.1 C15.1 C16.1 C17.2 C18.1 C19.2 C20.1 C21.1 C22.2 C23.2 C24.1 C25.1 C26.1 C27.1 C28_U_16_RGBs1.2 C28_U_16_RGBs2.2 C28_U_16_RGBs3.2 C28_U_16_RGBs4.2 C28_U_16_RGBs5.2 C28_U_16_RGBs6.2 C29_U_16_RGBs1.2 C29_U_16_RGBs2.2 C29_U_16_RGBs3.2 C29_U_16_RGBs4.2 C29_U_16_RGBs5.2 C29_U_16_RGBs6.2 C30_U_16_RGBs1.2 C30_U_16_RGBs2.2 C30_U_16_RGBs3.2 C30_U_16_RGBs4.2 C30_U_16_RGBs5.2 C30_U_16_RGBs6.2 C31_U_16_RGBs1.1 C31_U_16_RGBs2.1 C31_U_16_RGBs3.1 C31_U_16_RGBs4.1 C31_U_16_RGBs5.1 C31_U_16_RGBs6.1 C32.1 C33.1 C34.1 C35.1 C36.1 C37.1 GND_W.1 MD1.1 MD1.2 MD1.11 MD1.14 MD1.36 MD1.37 MD1.38 MD1.39 MD1.40 MD1.41 MD1.42 MD1.43 MD1.44 MD1.45 MD1.46 MD1.47 MD1.48 MD1.49 MD1.50 MD1.51 MD1.52 MD1.53 pad.2 R1.1 R2.1 R13_U_16_RGBs1.2 R13_U_16_RGBs2.2 R13_U_16_RGBs3.2 R13_U_16_RGBs4.2 R13_U_16_RGBs5.2 R13_U_16_RGBs6.2 R14_U_16_RGBs1.2 R14_U_16_RGBs2.2 R14_U_16_RGBs3.2 R14_U_16_RGBs4.2 R14_U_16_RGBs5.2 R14_U_16_RGBs6.2 R15_U_16_RGBs1.2 R15_U_16_RGBs2.2 R15_U_16_RGBs3.2 R15_U_16_RGBs4.2 R15_U_16_RGBs5.2 R15_U_16_RGBs6.2 R16.1 SW1.1 SW2.1 SW3.1 SW4.1 U1.47 U1.61 U2.4 U3.1 U4.2 U5.2 U6_U_16_RGBs1.1 U6_U_16_RGBs2.1 U6_U_16_RGBs3.1 U6_U_16_RGBs4.1 U6_U_16_RGBs5.1 U6_U_16_RGBs6.1 U7_U_16_RGBs1.1 U7_U_16_RGBs2.1 U7_U_16_RGBs3.1 U7_U_16_RGBs4.1 U7_U_16_RGBs5.1 U7_U_16_RGBs6.1 U8_U_16_RGBs1.1 U8_U_16_RGBs2.1 U8_U_16_RGBs3.1 U8_U_16_RGBs4.1 U8_U_16_RGBs5.1 U8_U_16_RGBs6.1 U9.1 U10.5 U10.6 USBC1.1 USBC1.2 USBC1.3 USBC1.4 USBC1.A1B12 USBC1.B1A12 Y1.2 Y1.4 | length 157.6
  Top Layer w0.1: C37.1@-19.35,11.025 v1(-18.569,11.025) ; R16.1@-16.752,11.2 v1(-15.997,11.2) ; v1(-15.375,17.4) SW1.1@-14.525,17.4 ; SW4.1@-12.025,-11 v1(-11.175,-11) ; U2.4@-5.834,16.899 U2.4@-5.831,16.895 ; C34.1@8.904,-8.825 9.029,-8.95 v1(9.758,-8.95) ; v1(13.95,-7.425) SW3.1@14.8,-7.425
  Top Layer w0.2: U10.6@-17.4,14.2 U10.5@-17.4,14.875 ; v3(7.55,14) 7.575,13.975 8.161,13.975 8.999,14.813 U1.47@8.999,15.45
  Top Layer w0.3: v1(-18.175,14.875) U10.5@-17.55,14.875 ; v1(-7.055,17.383) -7.055,17.346 -6.608,16.899 U2.4@-5.834,16.899 ; SW2.1@-2.25,15.325 -1.875,14.95 -0.999,14.95 -0.849,14.8 v1(-0.808,14.8) C12.1@-0.029,14.8 ; v1(-0.679,13.1) 0.1,13.1 C3.1@0.2,13.2 ; v1(-0.608,10.693) -0.567,10.693 -0.461,10.8 C11.1@0.246,10.8 ; Y1.2@-0.25,6.3 -0.084,6.466 v1(-0.084,7.325) ; C12.1@0.146,14.8 C12.1@0.246,14.9 ; Y1.4@1.45,8.5 1.761,8.189 v1(2.496,8.189) ; C17.2@2.275,21.875 3.104,21.875 v1(3.129,21.85) ; v1(2.292,7.216) 2.302,7.206 2.84,7.206 C18.1@3.146,6.9 ; v1(2.883,4.619) 2.883,5.183 C19.2@3.1,5.4 ; v1(3.344,18.875) 4.05,18.875 C9.1@4.125,18.95 ; v1(4.925,18.825) 5.475,18.825 C10.1@5.75,18.55 ; v1(7.119,5.2) 7.846,5.2 C2.1@7.9,5.146 ; C8.1@9.5,5.1 9.525,5.125 v1(10.281,5.125) ; v1(10.494,15.525) 11.125,15.525 C14.1@11.3,15.7 ; C7.1@12.429,8.025 12.436,8.018 v1(13.258,8.018) ; C6.1@12.954,10.5 13.2,10.746 v1(13.2,11.306) ; C1.1@12.954,12.2 13.1,12.346 v1(13.1,13.006) ; C5.1@12.954,13.9 13.2,14.146 v1(13.2,14.7) ; C4.1@14.3,15.7 v1(14.3,16.506) 14.3,16.547 14.375,16.622 C13.1@14.375,17.625
  Top Layer w0.5: MD1.50@-5.95,-16.8 -5.925,-16.775 -4.825,-16.775 MD1.36@-4.8,-16.75 ; MD1.51@-5.95,-6.9 v1(-5.95,-6.225) ; v2(-4.8,-15.925) MD1.36@-4.8,-16.75 ; v2(-3.2,-15.925) MD1.38@-3.2,-16.75 ; MD1.39@-2.35,-16.7 MD1.39@-2.4,-16.75 ; MD1.49@-2.35,-14.2 MD1.49@-1.975,-13.825 ; v2(-1.6,-15.925) MD1.40@-1.6,-16.75 ; v2(0,-15.925) MD1.42@0,-16.75 ; v2(1.6,-15.925) MD1.44@1.6,-16.75 ; v2(3.2,-15.925) MD1.46@3.2,-16.75 ; MD1.14@3.2,-6.95 v2(3.2,-7.775) 3.241,-7.775 3.316,-7.85 MD1.11@5.9,-7.85 5.925,-7.825 5.925,-6.925 MD1.52@5.95,-6.9 ; v3(4.325,12.95) 5.476,12.95 5.85,13.324 v3(5.85,14.125) ; v3(4.4,11.4) 6.075,11.4 6.1,11.375 U1.61@6.599,11.874 ; v3(4.481,10.65) 5.148,10.65 U1.61@5.148,10.675 ; v2(4.8,-15.925) MD1.48@4.8,-16.75 ; v2(5.075,-15.05) MD1.2@5.9,-15.05 MD1.1@5.9,-15.85 5.925,-15.875 MD1.53@5.925,-16.775 ; v3(5.456,9.656) 5.456,10.423 5.458,10.425 U1.61@6.05,10.425 ; MD1.53@5.95,-16.8 MD1.53@5.925,-16.775 ; U1.61@6.075,11.35 6.1,11.325 U1.61@6.1,10.425 ; U1.61@6.1,10.282 6.1,9.823 v3(6.286,9.637) ; U1.61@6.75,12.325 6.6,12.475 6.6,13.975 v3(6.75,14.125) ; v3(7.525,9.75) 7.525,10.947 U1.61@7.172,11.3 ; v3(7.55,14) 7.55,13.274 7.824,13 8.019,13.195 v3(8.745,13.195) ; v3(8.701,12.075) 6.8,12.075 U1.61@6.599,11.874 ; v3(8.732,11.3) U1.61@7.172,11.3 ; C15.1@9.65,17.104 C15.1@9.654,17.1 ; C16.1@9.65,18.796 C16.1@9.654,18.8 ; MD1.36@-4.8,-16.75 MD1.37@-4,-16.75 MD1.38@-3.2,-16.75 ; MD1.38@-3.2,-16.75 MD1.39@-2.4,-16.75 ; MD1.39@-2.4,-16.75 MD1.40@-1.6,-16.75 ; MD1.40@-1.6,-16.75 MD1.41@-0.8,-16.75 MD1.42@0,-16.75 ; MD1.42@0,-16.75 MD1.43@0.8,-16.75 MD1.44@1.6,-16.75 ; MD1.44@1.6,-16.75 MD1.45@2.4,-16.75 MD1.46@3.2,-16.75 ; MD1.46@3.2,-16.75 MD1.47@4,-16.75 MD1.48@4.8,-16.75 ; MD1.48@4.8,-16.75 4.825,-16.775 MD1.53@5.925,-16.775 ; U1.61@6.599,11.874 U1.61@7.172,11.3
  Top Layer w0.65: C20.1@-13,7.954 -13,8.027 -12.869,8.158 -12.422,8.158 v2(-12.119,8.461) ; C21.1@-13,11.1 -11.925,11.1 -11.15,11.875 U3.1@-10.9,11.875 ; v2(-10.425,-16.506) C23.2@-10.425,-15.625 ; v2(-10.425,-13.044) -10.425,-13.2 -10.421,-13.204 C22.2@-10.421,-13.925 ; v2(-9.554,10.879) -9.654,10.879 -10.65,11.875 U3.1@-10.9,11.875 ; v2(-9.475,11.875) U3.1@-10.9,11.875 ; C35.1@9,-16.404 9.109,-16.404 9.131,-16.426 9.999,-16.426 v2(10,-16.425) ; v2(10.85,-9.475) U9.1@10.85,-10.65 v2(12.275,-10.65)
  Top Layer w0.8: C15.1@9.65,17.104 C16.1@9.65,18.796
  Top Layer w1: C32.1@7.45,-16.4 7.452,-16.402 8.998,-16.402 C35.1@9,-16.404 ; C33.1@7.475,-11.95 C36.1@8.975,-11.95 8.99,-11.95 9.34,-11.6 9.65,-11.6 10.6,-10.65 U9.1@10.85,-10.65
  Bottom Layer w0.1: R1.1@-8.473,10 v1(-7.719,10) ; R2.1@-6.973,12 v1(-6.219,12)
  Bottom Layer w0.3: U4.2@-101.25,0.1 v1(-100.275,0.1) ; v1(-101.079,-2.4) C25.1@-100.2,-2.4 ; v1(-101.079,2.5) C24.1@-100.2,2.5 ; v1(-91.464,4.808) R15_U_16_RGBs3.2@-90.684,4.808 ; U8_U_16_RGBs3.1@-87.215,-2.685 -87.215,-3.243 -86.941,-3.516 -86.801,-3.516 v1(-86.772,-3.545) ; v1(-86.254,4.002) C30_U_16_RGBs3.2@-86.254,4.808 ; C31_U_16_RGBs3.1@-81.214,4.808 -81.206,4.8 -80.664,4.8 v1(-80.664,4.425) ; -80.664,4.808 R14_U_16_RGBs3.2@-79.884,4.808 ; U7_U_16_RGBs3.1@-76.545,-2.685 -76.545,-3.255 -76.171,-3.629 v1(-76.17,-3.629) ; v1(-75.554,4.002) C29_U_16_RGBs3.2@-75.554,4.808 ; v1(-70.164,4.425) -70.135,4.454 -70.135,4.55 -69.977,4.708 R13_U_16_RGBs3.2@-69.384,4.708 ; U6_U_16_RGBs3.1@-65.885,-2.685 -65.885,-3.243 -65.558,-3.57 -65.511,-3.57 v1(-65.482,-3.599) ; v1(-65.008,3.902) C28_U_16_RGBs3.2@-65.008,4.708 ; v1(-59.427,4.425) -59.421,4.431 -59.421,4.683 -59.304,4.8 -58.656,4.8 R15_U_16_RGBs2.2@-58.648,4.808 ; U8_U_16_RGBs2.1@-55.179,-2.684 -55.179,-3.242 -54.905,-3.516 -54.765,-3.516 v1(-54.736,-3.545) ; v1(-54.217,4.002) C30_U_16_RGBs2.2@-54.217,4.808 ; C31_U_16_RGBs2.1@-49.177,4.808 -49.169,4.8 -48.627,4.8 v1(-48.627,4.425) ; -48.627,4.808 R14_U_16_RGBs2.2@-47.848,4.808 ; U7_U_16_RGBs2.1@-44.509,-2.684 -44.509,-3.254 -44.135,-3.628 v1(-44.133,-3.628) ; v1(-43.517,4.002) C29_U_16_RGBs2.2@-43.517,4.808 ; v1(-38.127,4.425) -38.099,4.454 -38.099,4.55 -37.941,4.708 R13_U_16_RGBs2.2@-37.348,4.708 ; U6_U_16_RGBs2.1@-33.849,-2.684 -33.849,-3.242 -33.521,-3.569 -33.474,-3.569 v1(-33.446,-3.598) ; v1(-32.971,3.902) C28_U_16_RGBs2.2@-32.971,4.708 ; v1(-27.41,4.425) -27.404,4.431 -27.404,4.683 -27.287,4.8 R15_U_16_RGBs1.2@-26.631,4.8 ; U8_U_16_RGBs1.1@-23.161,-2.692 -23.161,-2.451 -23.136,-2.425 v1(-22.625,-2.425) ; v1(-22.2,3.994) C30_U_16_RGBs1.2@-22.2,4.8 ; C31_U_16_RGBs1.1@-17.16,4.8 -16.76,4.8 -16.61,4.65 v1(-16.61,4.45) ; -16.61,4.8 R14_U_16_RGBs1.2@-15.831,4.8 ; v1(-13.698,8.7) -13.669,8.729 -13.669,8.901 -13.662,8.909 -13.662,9.113 -13.3,9.475 -13.3,9.641 USBC1.A1B12@-13.455,9.797 ; U7_U_16_RGBs1.1@-12.491,-2.692 -12.491,-3.263 -12.118,-3.636 v1(-12.116,-3.636) ; C29_U_16_RGBs1.2@-11.5,4.8 -11.5,4.044 v1(-11.475,4.019) ; USBC1.B1A12@-8.93,14.322 -8.682,14.075 -7.85,14.075 v1(-7.825,14.05) ; v1(-6.471,5.061) -6.085,4.675 -5.356,4.675 R13_U_16_RGBs1.2@-5.331,4.7 ; U6_U_16_RGBs1.1@-1.831,-2.692 -1.831,-3.25 -1.504,-3.577 -1.457,-3.577 v1(-1.429,-3.606) ; v1(-1.415,3.881) -1.387,3.91 -1.111,3.91 -0.954,4.067 C28_U_16_RGBs1.2@-0.954,4.7 ; C28_U_16_RGBs4.2@0.9,-4.7 v1(0.9,-3.894) ; U6_U_16_RGBs4.1@1.777,2.692 1.796,2.711 1.796,3.283 2.107,3.594 v1(2.107,3.691) ; R13_U_16_RGBs4.2@5.277,-4.7 v1(6.056,-4.7) ; C29_U_16_RGBs4.2@11.446,-4.8 11.446,-4.18 11.604,-4.023 11.696,-4.023 v1(11.725,-3.994) ; v1(11.955,3.406) 11.995,3.406 12.126,3.276 12.412,3.276 12.438,3.25 U7_U_16_RGBs4.1@12.438,2.692 ; R14_U_16_RGBs4.2@15.777,-4.8 v1(16.556,-4.8) C31_U_16_RGBs4.1@17.106,-4.8 ; C30_U_16_RGBs4.2@22.146,-4.8 v1(22.146,-3.994) ; v1(22.646,3.465) 22.675,3.436 22.921,3.436 23.108,3.25 U8_U_16_RGBs4.1@23.108,2.692 ; R15_U_16_RGBs4.2@26.577,-4.8 v1(27.356,-4.8) ; C28_U_16_RGBs5.2@32.9,-4.7 v1(32.9,-3.894) ; v1(33.375,3.606) 33.403,3.577 33.45,3.577 33.777,3.25 U6_U_16_RGBs5.1@33.777,2.692 ; R13_U_16_RGBs5.2@37.277,-4.7 v1(38.056,-4.7) ; C29_U_16_RGBs5.2@43.446,-4.8 v1(43.446,-3.994) ; v1(44.062,3.636) 44.064,3.636 44.438,3.263 U7_U_16_RGBs5.1@44.438,2.692 ; R14_U_16_RGBs5.2@47.777,-4.8 v1(48.556,-4.8) C31_U_16_RGBs5.1@49.106,-4.8 ; C30_U_16_RGBs5.2@54.146,-4.8 v1(54.146,-3.994) ; v1(54.665,3.553) 54.694,3.524 54.834,3.524 55.107,3.25 U8_U_16_RGBs5.1@55.107,2.692 ; R15_U_16_RGBs5.2@58.577,-4.8 v1(59.356,-4.8) ; C28_U_16_RGBs6.2@64.9,-4.7 v1(64.9,-3.894) ; v1(65.375,3.606) 65.403,3.577 65.45,3.577 65.778,3.25 U6_U_16_RGBs6.1@65.778,2.692 ; R13_U_16_RGBs6.2@69.277,-4.7 v1(70.056,-4.7) ; C29_U_16_RGBs6.2@75.446,-4.8 v1(75.446,-3.994) ; v1(76.062,3.636) v1(76.062,3.636) 76.438,3.263 U7_U_16_RGBs6.1@76.438,2.692 ; R14_U_16_RGBs6.2@79.777,-4.8 v1(80.556,-4.8) C31_U_16_RGBs6.1@81.106,-4.8 ; C30_U_16_RGBs6.2@86.146,-4.8 v1(86.146,-3.994) ; v1(86.665,3.553) 86.694,3.524 86.834,3.524 87.108,3.25 U8_U_16_RGBs6.1@87.108,2.692 ; R15_U_16_RGBs6.2@90.577,-4.8 v1(91.356,-4.8) ; C27.1@100.154,-2.6 v1(101.033,-2.6) ; C26.1@100.154,2.5 v1(101.033,2.5) ; v1(100.275,0) U5.2@101.25,0
  other v1: 0.821,-3.075 -12,14.025 9.65,17.925
  other v4: -0.988,-13.825 0.988,-13.825 -1.975,-12.838 0,-12.838 1.975,-12.838 -0.988,-11.85 0.988,-11.85 -1.975,-10.862 0,-10.862 1.975,-10.862 -0.988,-9.875 0.988,-9.875
LE: U1.31 U6_U_16_RGBs1.4 U6_U_16_RGBs2.4 U6_U_16_RGBs3.4 U6_U_16_RGBs4.4 U6_U_16_RGBs5.4 U6_U_16_RGBs6.4 U7_U_16_RGBs1.4 U7_U_16_RGBs2.4 U7_U_16_RGBs3.4 U7_U_16_RGBs4.4 U7_U_16_RGBs5.4 U7_U_16_RGBs6.4 U8_U_16_RGBs1.4 U8_U_16_RGBs2.4 U8_U_16_RGBs3.4 U8_U_16_RGBs4.4 U8_U_16_RGBs5.4 U8_U_16_RGBs6.4 | length 227.3
  Top Layer w0.1: v1(-89.088,-4.061) -83.665,-4.061 -83.526,-4.2 -78.197,-4.2 ; v1(-78.118,-3.668) -78.185,-3.735 -78.185,-4.029 -78.197,-4.042 -78.197,-4.2 ; v1(-67.423,-3.683) -67.356,-3.75 -67.356,-4.194 -67.363,-4.2 -78.197,-4.2 ; -67.35,-4.2 -56.723,-4.2 ; v1(-56.758,-3.673) -56.781,-3.696 -56.781,-4.141 -56.723,-4.2 ; v1(-46.051,-3.68) -45.996,-3.735 -45.996,-3.954 -45.897,-4.053 -45.897,-4.2 ; v1(-35.416,-3.663) -35.397,-3.681 -35.397,-4.2 ; v1(-24.733,-3.674) -24.325,-4.081 -24.325,-4.2 ; v1(-14.065,-3.676) -13.541,-4.2 ; v1(-3.679,-3.79) -4.173,-3.79 -4.583,-4.2 ; v1(4,3.655) 3.411,4.244 2.728,4.244 2.508,4.464 2.508,4.467 2.37,4.606 2.059,4.606 1.532,4.078 1.532,3.195 1.65,3.077 1.65,2.194 1.041,1.586 0.554,1.586 -0.054,0.978 -0.054,-1.481 -0.855,-2.281 -1.64,-2.281 -3.559,-4.2 -4.583,-4.2 ; v1@4.031,3.686 5.07,4.725 7.124,4.725 7.439,4.41 8.219,4.41 8.608,4.021 10.841,4.021 10.97,4.15 13.275,4.15 13.625,3.8 13.95,3.8 v1(14,3.75) ; U1.31@10.175,9.075 12.735,9.075 15.285,6.525 15.285,5.41 14.035,4.16 14.035,3.785 v1(14,3.75) ; v1(24.685,3.679) 24.697,3.692 v1@24.697,3.832 ; v1(35.345,3.671) 35.278,3.738 35.278,4.032 35.25,4.06 35.25,4.2 ; v1(46.02,3.683) 45.997,3.705 45.997,4.2 ; v1(56.675,3.671) 56.697,3.693 56.697,4.2 ; v1(67.346,3.672) 67.369,3.695 67.369,4.141 67.31,4.2 ; v1(78.02,3.683) 77.953,3.75 77.953,3.998 77.897,4.053 77.897,4.2 ; v1(88.683,3.677) 88.16,4.2 77.897,4.2 ; -56.723,-4.2 -45.897,-4.2 ; -45.897,-4.2 -35.397,-4.2 ; -35.397,-4.2 -24.325,-4.2 ; -24.325,-4.2 -23.87,-4.2 -22.25,-2.58 -22.25,-1.97 -21.638,-1.358 -21.298,-1.358 -18.456,-4.2 -13.541,-4.2 ; -13.541,-4.2 -4.583,-4.2 ; v1(14,3.75) 14.043,3.75 14.323,4.03 24.254,4.03 24.53,3.753 24.619,3.753 v1@24.697,3.832 ; v1@24.697,3.832 24.697,4.2 35.25,4.2 ; 35.25,4.2 45.997,4.2 ; 45.997,4.2 56.697,4.2 ; 56.697,4.2 67.31,4.2 ; 67.31,4.2 77.897,4.2
  Bottom Layer w0.1: U8_U_16_RGBs3.4@-89.12,-2.685 -89.104,-2.701 -89.104,-4.045 v1(-89.088,-4.061) ; U7_U_16_RGBs3.4@-78.45,-2.685 -78.45,-3.296 -78.118,-3.629 v1(-78.118,-3.668) ; U6_U_16_RGBs3.4@-67.79,-2.685 -67.79,-3.287 -67.423,-3.654 v1(-67.423,-3.683) ; U8_U_16_RGBs2.4@-57.084,-2.684 -57.084,-3.302 -56.758,-3.627 v1(-56.758,-3.673) ; U7_U_16_RGBs2.4@-46.414,-2.684 -46.414,-3.287 -46.051,-3.649 v1(-46.051,-3.68) ; U6_U_16_RGBs2.4@-35.754,-2.684 -35.754,-3.291 -35.416,-3.629 v1(-35.416,-3.663) ; U8_U_16_RGBs1.4@-25.066,-2.692 -25.066,-3.303 -24.733,-3.637 v1(-24.733,-3.674) ; U7_U_16_RGBs1.4@-14.396,-2.692 -14.396,-3.305 -14.065,-3.636 v1(-14.065,-3.676) ; U6_U_16_RGBs1.4@-3.736,-2.692 -3.708,-2.721 -3.708,-3.761 v1(-3.679,-3.79) ; U6_U_16_RGBs4.4@3.682,2.692 3.682,3.301 4,3.619 v1(4,3.655) ; v1(14,3.75) 14.294,3.456 14.294,2.741 U7_U_16_RGBs4.4@14.343,2.692 ; v1(24.685,3.679) 24.685,3.636 25.013,3.309 U8_U_16_RGBs4.4@25.013,2.692 ; v1(35.345,3.671) 35.345,3.637 35.682,3.299 U6_U_16_RGBs5.4@35.682,2.692 ; v1(46.02,3.683) 46.02,3.635 46.343,3.313 U7_U_16_RGBs5.4@46.343,2.692 ; v1(56.675,3.671) 56.675,3.637 57.012,3.299 U8_U_16_RGBs5.4@57.012,2.692 ; v1(67.346,3.672) 67.346,3.637 67.683,3.3 U6_U_16_RGBs6.4@67.683,2.692 ; v1(78.02,3.683) 78.02,3.635 78.343,3.313 U7_U_16_RGBs6.4@78.343,2.692 ; v1(88.683,3.677) 88.683,3.636 89.013,3.306 U8_U_16_RGBs6.4@89.013,2.692
Net5V_W_1: 5V_W.1 D2.2 | length 3.4
  Top Layer w1.5: D2.2@-14.325,-10.85 -14.325,-9 -13.425,-8.1 5V_W.1@-13.425,-7.825
NetC14_2: C14.2 R3.2 U1.46 | length 3.7
  Top Layer w0.1: U1.46@9.398,15.45 9.398,15.787 9.448,15.837 10.156,15.837 11.3,16.981 C14.2@11.3,17.054
  Top Layer w0.5: C14.2@11.3,17.054 R3.2@11.3,17.95
NetC18_2: C18.2 U1.21 Y1.1 | length 7.9
  Top Layer w0.1: Y1.1@-0.25,8.5 0.166,8.084 0.166,7.709 0.284,7.591 2.447,7.591 2.532,7.506 3.547,7.506 3.554,7.513 3.887,7.513 4.021,7.379 4.021,7.306 4.427,6.9 C18.2@4.5,6.9 4.573,6.9 5.227,7.554 5.579,7.554 5.748,7.723 5.748,8.25 U1.21@5.798,8.3
NetC19_1: C19.1 R7.1 Y1.3 | length 5.1
  Top Layer w0.1: Y1.3@1.45,6.3 2.549,6.3 2.555,6.294 3.56,6.294 3.975,5.879 3.975,5.806 4.381,5.4 6.077,5.4 R7.1@6.1,5.423
NetC24_2: C24.2 R9.1 U4.1 | length 3.7
  Bottom Layer w0.1: C24.2@-98.846,2.5 -98.75,2.404 U4.1@-98.75,1.05 -98.476,1.05 -97.506,2.02 -97.506,2.044 -97.127,2.423 R9.1@-97.1,2.423
NetC25_2: C25.2 R10.1 U1.8 U4.3 | length 115.2
  Top Layer w0.1: v1(-97.7,-0.9) -97.633,-0.833 -97.633,-0.486 -94.822,2.325 -21.566,2.325 -21.498,2.393 -21.444,2.393 -21.248,2.589 -6.286,2.589 -4.618,4.257 -4.618,4.34 -4.951,4.674 -4.951,4.984 -4.732,5.204 -4.421,5.204 -4.087,4.87 -4.005,4.87 -3.256,5.619 -3.256,6.373 -2.856,6.772 -1.932,6.772 -1.199,7.505 -1.199,9.345 -1.2,9.345 -1.2,9.913 -0.821,10.293 -0.821,10.375 -1.008,10.563 -1.008,10.955 -0.557,11.406 0.12,11.406 1.07,12.356 1.381,12.356 1.863,11.874 U1.8@3.025,11.874
  Bottom Layer w0.1: C25.2@-98.846,-2.4 -98.75,-2.304 U4.3@-98.75,-0.85 ; U4.3@-98.476,-0.85 U4.3@-98.75,-0.85 ; U4.3@-98.413,-0.913 -97.406,-1.92 -97.406,-1.944 -97.027,-2.323 R10.1@-97,-2.323 ; v1(-97.7,-0.9) -98.4,-0.9 -98.45,-0.85 U4.3@-98.75,-0.85
NetC26_2: C26.2 R11.1 U1.32 U5.3 | length 97.7
  Top Layer w0.1: U1.32@10.175,9.476 15.082,9.476 16.506,10.9 18.6,10.9 19.9,9.6 19.9,8 22.9,5 93.6,5 v1(97.7,0.9)
  Bottom Layer w0.1: R11.1@97,2.423 97.027,2.423 98.175,1.275 98.175,1.25 98.476,0.95 98.426,0.9 v1(97.7,0.9) ; U5.3@98.75,0.95 98.8,1 C26.2@98.8,2.5
NetC27_2: C27.2 R12.1 U5.1 | length 4
  Bottom Layer w0.1: R12.1@97,-2.423 97.027,-2.423 98.175,-1.275 98.175,-1.25 98.476,-0.95 U5.1@98.75,-0.95 98.75,-2.55 C27.2@98.8,-2.6
NetD1_2: D1.2 USBC1.A4B9 USBC1.B4A9 | length 15.8
  Bottom Layer w0.6: USBC1.A4B9@-12.899,10.362 -11.394,8.858 -11.394,8.719 D1.2@-10.05,7.375 -9.35,8.075 -8.76,8.075 -5.594,11.241 -5.594,12.259 -6.219,12.884 -8.623,12.884 USBC1.B4A9@-9.496,13.756
NetL1_1: L1.1 U1.48 | length 6.6
  Top Layer w0.3: U1.48@8.598,15.484 8.598,15.94 8.923,16.265 10.157,16.265 10.433,16.54 10.433,19.392 9.75,20.075 9.725,20.075 9.599,20.2 L1.1@9.599,20.226
NetMD1_5: MD1.5 R19.1 U1.19 | length 32.8
  Top Layer w0.1: U1.19@4.998,8.3 4.998,8.887 5.193,9.082 v1(5.193,9.145) ; v1(5.352,6.405) 5.359,6.397 6.428,6.397 6.84,5.985 6.84,5.737 v1(6.881,5.696) ; MD1.5@5.9,-12.65 5.7,-12.65 5.35,-12.3 5.35,-8.388 5.488,-8.25 6.575,-8.25 7.448,-7.377 7.448,-6.352 v1(10,-3.8) ; v1(8.438,3.661) 8.533,3.661 8.73,3.464 8.842,3.464 10.558,1.747 v1(10.558,1.607)
  Bottom Layer w0.1: v1(5.193,9.145) 5.257,9.081 6.366,9.081 6.79,9.505 7.125,9.505 7.35,9.28 7.35,8.949 5.352,6.95 v1(5.352,6.405) ; v1(6.881,5.696) 6.881,5.601 6.675,5.395 6.675,5.114 7.365,4.424 7.616,4.424 7.66,4.38 7.66,3.88 7.88,3.66 v1@8.437,3.66 ; v1(10,-3.8) 10,0.775 10.491,1.266 10.491,1.54 v1(10.558,1.607)
NetMD1_12: MD1.12 U1.27 | length 22.7
  Top Layer w0.1: MD1.12@4.8,-6.95 4.8,-6.75 6.05,-5.5 7.303,-5.5 9.478,-3.325 v1(10.825,-3.325) ; v1(8.169,9.144) 8.184,9.129 8.184,8.315 U1.27@8.199,8.3 ; v1(11.125,3.775) 11.145,3.755 11.145,1.675 11.205,1.675 v1(11.571,1.308)
  Bottom Layer w0.1: v1(8.169,9.144) 10.656,6.656 10.656,4.244 v1(11.125,3.775) ; v1(10.825,-3.325) 11.165,-2.985 11.165,0.914 11.176,0.925 11.205,0.925 11.571,1.291 v1(11.571,1.308)
NetMD1_16: MD1.16 U1.17 | length 29.4
  Top Layer w0.1: MD1.16@1.6,-6.95 1.6,-6.75 3.225,-5.125 v1(6.466,-5.125) ; U1.17@4.198,8.3 4.198,8.915 4.443,9.16 v1(4.443,9.2) ; v1(5.35,4.35) 5.665,4.035 v1(8.035,4.035) ; v1(10.725,2.475) 10.725,2.38 10.933,2.172 10.933,1.604 10.955,1.583 10.955,1.367 v1(11.022,1.3)
  Bottom Layer w0.1: v1(4.443,9.2) 4.443,7.312 4.325,7.194 4.325,5.375 v1(5.35,4.35) ; v1(6.466,-5.125) 9.205,-5.125 10.45,-3.88 10.45,0.7 11.022,1.272 v1(11.022,1.3) ; v1@8.036,4.036 9.164,4.036 v1(10.725,2.475)
NetMD1_20: MD1.20 U1.18 | length 19.4
  Top Layer w0.1: MD1.20@-1.6,-6.95 -1.6,-5.127 -1.804,-4.924 -1.804,-3.451 -0.834,-2.481 -0.517,-2.481 v1(0.52,-1.445) ; v1(1.275,2.65) 1.275,4.514 1.736,4.975 1.879,4.975 v1(2.246,5.342) ; v1(3.25,7.881) 3.345,7.881 3.513,7.713 4.361,7.713 4.449,7.801 4.449,7.812 4.6,7.963 U1.18@4.6,8.3
  Bottom Layer w0.1: v1(0.52,-1.445) 0.55,-1.414 0.55,2.256 0.9,2.605 1.23,2.605 v1(1.275,2.65) ; v1(2.246,5.342) 2.246,6.338 3.347,7.439 3.347,7.539 3.317,7.57 3.317,7.814 v1(3.25,7.881)
NetMD1_21: MD1.21 U1.16 | length 21.3
  Top Layer w0.1: MD1.21@-2.4,-6.95 -2.4,-7.15 -2.05,-7.5 -1.338,-7.5 -1.15,-7.312 -1.15,-5.414 0.745,-3.519 0.907,-3.519 1.242,-3.184 1.242,-2.312 1.025,-2.095 v1(1.025,-2) ; v1(1.887,1.629) 1.887,1.724 1.96,1.797 1.96,3.307 1.732,3.536 1.732,3.847 1.951,4.066 1.955,4.066 2.12,4.231 v1(2.214,4.231) ; v1(3.3,8.45) 3.749,8.45 3.799,8.4 U1.16@3.799,8.3
  Bottom Layer w0.1: v1(1.025,-2) 1.887,-1.138 v1(1.887,1.629) ; v1(2.214,4.231) 2.232,4.248 2.818,4.248 2.822,4.244 3.141,4.244 3.722,4.825 3.722,8.082 3.355,8.45 v1(3.3,8.45)
NetMD1_22: MD1.22 R18.2 | length 2.8
  Top Layer w0.1: R18.2@-4.998,-4.975 -4.998,-5.002 -3.8,-6.2 -3.655,-6.2 -3.45,-6.405 -3.45,-6.5 -3.2,-6.75 MD1.22@-3.2,-6.95
NetR1_2: R1.2 USBC1.A5 | length 2.5
  Bottom Layer w0.1: USBC1.A5@-12.077,11.175 -12.077,11.16 -10.916,10 R1.2@-10.027,10
NetR2_2: R2.2 USBC1.B5 | length 2
  Bottom Layer w0.1: USBC1.B5@-9.955,13.297 -9.814,13.297 -8.923,12.406 -8.906,12.406 -8.527,12.027 R2.2@-8.527,12
NetR7_2: R7.2 U1.22 | length 1.4
  Top Layer w0.1: R7.2@6.1,6.977 6.2,7.077 U1.22@6.2,8.3
NetR8_1: R8.1 U1.26 | length 13.8
  Top Layer w0.1: R8.1@-2.45,5.798 -2.423,5.798 -1.849,6.372 -1.689,6.372 -0.911,7.15 -0.904,7.15 -0.729,7.325 v1(-0.634,7.325) ; v1(6.945,9.13) 6.989,9.13 7.232,8.887 7.561,8.887 7.649,8.799 7.649,8.788 7.8,8.637 U1.26@7.8,8.3
  Bottom Layer w0.1: v1(-0.634,7.325) -0.634,7.42 -0.479,7.575 -0.479,7.629 -0.408,7.7 -0.408,7.938 1.749,10.095 2.805,10.095 2.897,10.003 4.178,10.003 4.818,9.363 4.818,8.99 5.102,8.706 6.464,8.706 6.888,9.13 v1(6.945,9.13)
NetR13_U_16_RGBs1_1: R13_U_16_RGBs1.1 U6_U_16_RGBs1.23 | length 2.6
  Bottom Layer w0.3: R13_U_16_RGBs1.1@-3.777,4.7 -3.498,4.421 -3.498,4.369 -2.851,3.722 -2.477,3.348 -2.477,2.703 U6_U_16_RGBs1.23@-2.466,2.692
NetR13_U_16_RGBs2_1: R13_U_16_RGBs2.1 U6_U_16_RGBs2.23 | length 2.6
  Bottom Layer w0.3: R13_U_16_RGBs2.1@-35.794,4.708 -35.515,4.429 -35.515,4.275 -34.524,3.284 -34.509,3.284 -34.484,3.258 U6_U_16_RGBs2.23@-34.484,2.701
NetR13_U_16_RGBs3_1: R13_U_16_RGBs3.1 U6_U_16_RGBs3.23 | length 2.6
  Bottom Layer w0.3: R13_U_16_RGBs3.1@-67.831,4.708 -67.551,4.428 -67.551,4.274 -66.561,3.283 -66.546,3.283 -66.52,3.258 U6_U_16_RGBs3.23@-66.52,2.7
NetR13_U_16_RGBs4_1: R13_U_16_RGBs4.1 U6_U_16_RGBs4.23 | length 2.6
  Bottom Layer w0.3: U6_U_16_RGBs4.23@2.412,-2.692 2.412,-3.25 2.438,-3.276 2.453,-3.276 3.444,-4.267 3.444,-4.421 R13_U_16_RGBs4.1@3.723,-4.7
NetR13_U_16_RGBs5_1: R13_U_16_RGBs5.1 U6_U_16_RGBs5.23 | length 2.6
  Bottom Layer w0.3: U6_U_16_RGBs5.23@34.412,-2.692 34.412,-3.25 34.438,-3.276 34.453,-3.276 35.444,-4.267 35.444,-4.421 R13_U_16_RGBs5.1@35.723,-4.7
NetR13_U_16_RGBs6_1: R13_U_16_RGBs6.1 U6_U_16_RGBs6.23 | length 2.6
  Bottom Layer w0.3: U6_U_16_RGBs6.23@66.413,-2.692 66.413,-3.25 66.438,-3.276 66.453,-3.276 67.444,-4.267 67.444,-4.421 R13_U_16_RGBs6.1@67.723,-4.7
NetR14_U_16_RGBs1_1: R14_U_16_RGBs1.1 U7_U_16_RGBs1.23 | length 2.6
  Bottom Layer w0.3: R14_U_16_RGBs1.1@-14.277,4.8 -13.998,4.521 -13.998,4.137 -13.126,3.265 U7_U_16_RGBs1.23@-13.126,2.692
NetR14_U_16_RGBs2_1: R14_U_16_RGBs2.1 U7_U_16_RGBs2.23 | length 2.6
  Bottom Layer w0.3: R14_U_16_RGBs2.1@-46.294,4.808 -46.015,4.529 -46.015,4.145 -45.144,3.273 U7_U_16_RGBs2.23@-45.144,2.701
NetR14_U_16_RGBs3_1: R14_U_16_RGBs3.1 U7_U_16_RGBs3.23 | length 2.6
  Bottom Layer w0.3: R14_U_16_RGBs3.1@-78.331,4.808 -78.051,4.528 -78.051,4.144 -77.18,3.273 U7_U_16_RGBs3.23@-77.18,2.7
NetR14_U_16_RGBs4_1: R14_U_16_RGBs4.1 U7_U_16_RGBs4.23 | length 2.6
  Bottom Layer w0.3: U7_U_16_RGBs4.23@13.073,-2.692 13.073,-3.265 13.944,-4.137 13.944,-4.521 R14_U_16_RGBs4.1@14.223,-4.8
NetR14_U_16_RGBs5_1: R14_U_16_RGBs5.1 U7_U_16_RGBs5.23 | length 2.6
  Bottom Layer w0.3: U7_U_16_RGBs5.23@45.073,-2.692 45.073,-3.265 45.944,-4.137 45.944,-4.521 R14_U_16_RGBs5.1@46.223,-4.8
NetR14_U_16_RGBs6_1: R14_U_16_RGBs6.1 U7_U_16_RGBs6.23 | length 2.6
  Bottom Layer w0.3: U7_U_16_RGBs6.23@77.073,-2.692 77.073,-3.265 77.944,-4.137 77.944,-4.521 R14_U_16_RGBs6.1@78.223,-4.8
NetR15_U_16_RGBs1_1: R15_U_16_RGBs1.1 U8_U_16_RGBs1.23 | length 2.6
  Bottom Layer w0.3: R15_U_16_RGBs1.1@-25.077,4.8 -24.798,4.521 -24.798,4.267 -23.796,3.265 U8_U_16_RGBs1.23@-23.796,2.692
NetR15_U_16_RGBs2_1: R15_U_16_RGBs2.1 U8_U_16_RGBs2.23 | length 2.6
  Bottom Layer w0.3: R15_U_16_RGBs2.1@-57.094,4.808 -56.815,4.529 -56.815,4.275 -55.814,3.273 U8_U_16_RGBs2.23@-55.814,2.701
NetR15_U_16_RGBs3_1: R15_U_16_RGBs3.1 U8_U_16_RGBs3.23 | length 2.6
  Bottom Layer w0.3: R15_U_16_RGBs3.1@-89.131,4.808 -88.851,4.528 -88.851,4.274 -87.85,3.273 U8_U_16_RGBs3.23@-87.85,2.7
NetR15_U_16_RGBs4_1: R15_U_16_RGBs4.1 U8_U_16_RGBs4.23 | length 2.6
  Bottom Layer w0.3: U8_U_16_RGBs4.23@23.743,-2.692 23.743,-3.265 24.744,-4.267 24.744,-4.521 R15_U_16_RGBs4.1@25.023,-4.8
NetR15_U_16_RGBs5_1: R15_U_16_RGBs5.1 U8_U_16_RGBs5.23 | length 2.6
  Bottom Layer w0.3: U8_U_16_RGBs5.23@55.742,-2.692 55.742,-3.265 56.744,-4.267 56.744,-4.521 R15_U_16_RGBs5.1@57.023,-4.8
NetR15_U_16_RGBs6_1: R15_U_16_RGBs6.1 U8_U_16_RGBs6.23 | length 2.6
  Bottom Layer w0.3: U8_U_16_RGBs6.23@87.743,-2.692 87.743,-3.265 88.744,-4.267 88.744,-4.521 R15_U_16_RGBs6.1@89.023,-4.8
NetR16_2: R16.2 SW5.2 U10.9 | length 11.4
  Top Layer w0.1: U10.9@-15.9,14.025 U10.9@-15.9,14.2 SW5.2@-14.225,14.2 ; R16.2@-15.198,11.2 -15.198,11.227 -14.819,11.606 -14.792,11.606 -14.221,12.177 -12.296,12.177 -12.05,12.423 -12.05,12.687 -11.792,12.945 -11.485,12.945 -11.475,12.936 -11.165,12.936 -10.898,13.203 -10.898,13.513 -11.023,13.639 -11.117,13.639 -11.204,13.725 -11.77,13.725 -11.856,13.639 -14.016,13.639 -14.075,13.697 SW5.2@-14.075,14.35
NetSWCLK_1: SWCLK.1 U1.24 | length 11.7
  Top Layer w0.1: U1.24@7,8.3 7,7.963 7.148,7.815 7.148,7.801 7.503,7.446 8.151,7.446 8.566,7.031 8.566,4.836 8.694,4.709 8.694,4.426 8.899,4.221 10.101,4.221 10.301,4.421 12.721,4.421 SWCLK.1@14.5,6.2
NetSWDIO_1: SWDIO.1 U1.25 | length 8.9
  Top Layer w0.1: U1.25@7.399,8.3 7.399,7.963 7.55,7.812 7.55,7.801 7.705,7.646 8.234,7.646 8.894,6.986 8.894,4.509 8.982,4.421 10.018,4.421 10.347,4.75 10.85,4.75 SWDIO.1@12.3,6.2
NetU1_2: U1.2 U8_U_16_RGBs3.2 | length 111.3
  Top Layer w0.1: U1.2@3.025,14.274 3.605,14.274 3.818,14.487 v1(3.913,14.487)
  Bottom Layer w0.1: U8_U_16_RGBs3.2@-87.85,-2.685 -87.85,-2.112 -87.294,-1.556 -87.294,-1.444 -84.796,1.054 -4.246,1.054 -3.508,1.792 -1.696,1.792 -1.504,1.984 -1.504,3.448 -1.445,3.506 -0.95,3.506 -0.275,4.182 -0.275,4.813 -0.275,5.218 -0.363,5.306 -2.881,5.306 -4.2,6.625 -4.2,9.247 -2.076,11.371 -1.878,11.371 -0.304,12.945 -0.304,13.295 0.901,14.5 2.32,14.5 2.332,14.488 3.912,14.488 v1(3.913,14.487)